# Altium PCB ProPrj_Project Ignis_2026-06-03.PcbDoc (part 1 of 2)
Units mm, origin at the board's own origin, x right, y up, seen from the top; angles counter-clockwise.
Board outline 123.2 x 67.87 mm, 18 copper layers (F.Cu, F.Mask, B.Cu, B.Mask, F.SilkS, B.SilkS, F.Adhes, B.Adhes, F.Paste, B.Paste, Dwgs.User, Cmts.User, Eco1.User, Eco2.User, Edge.Cuts, Margin, B.CrtYd, F.CrtYd); 71 components, 0 nets, 328 pads, 147 vias.
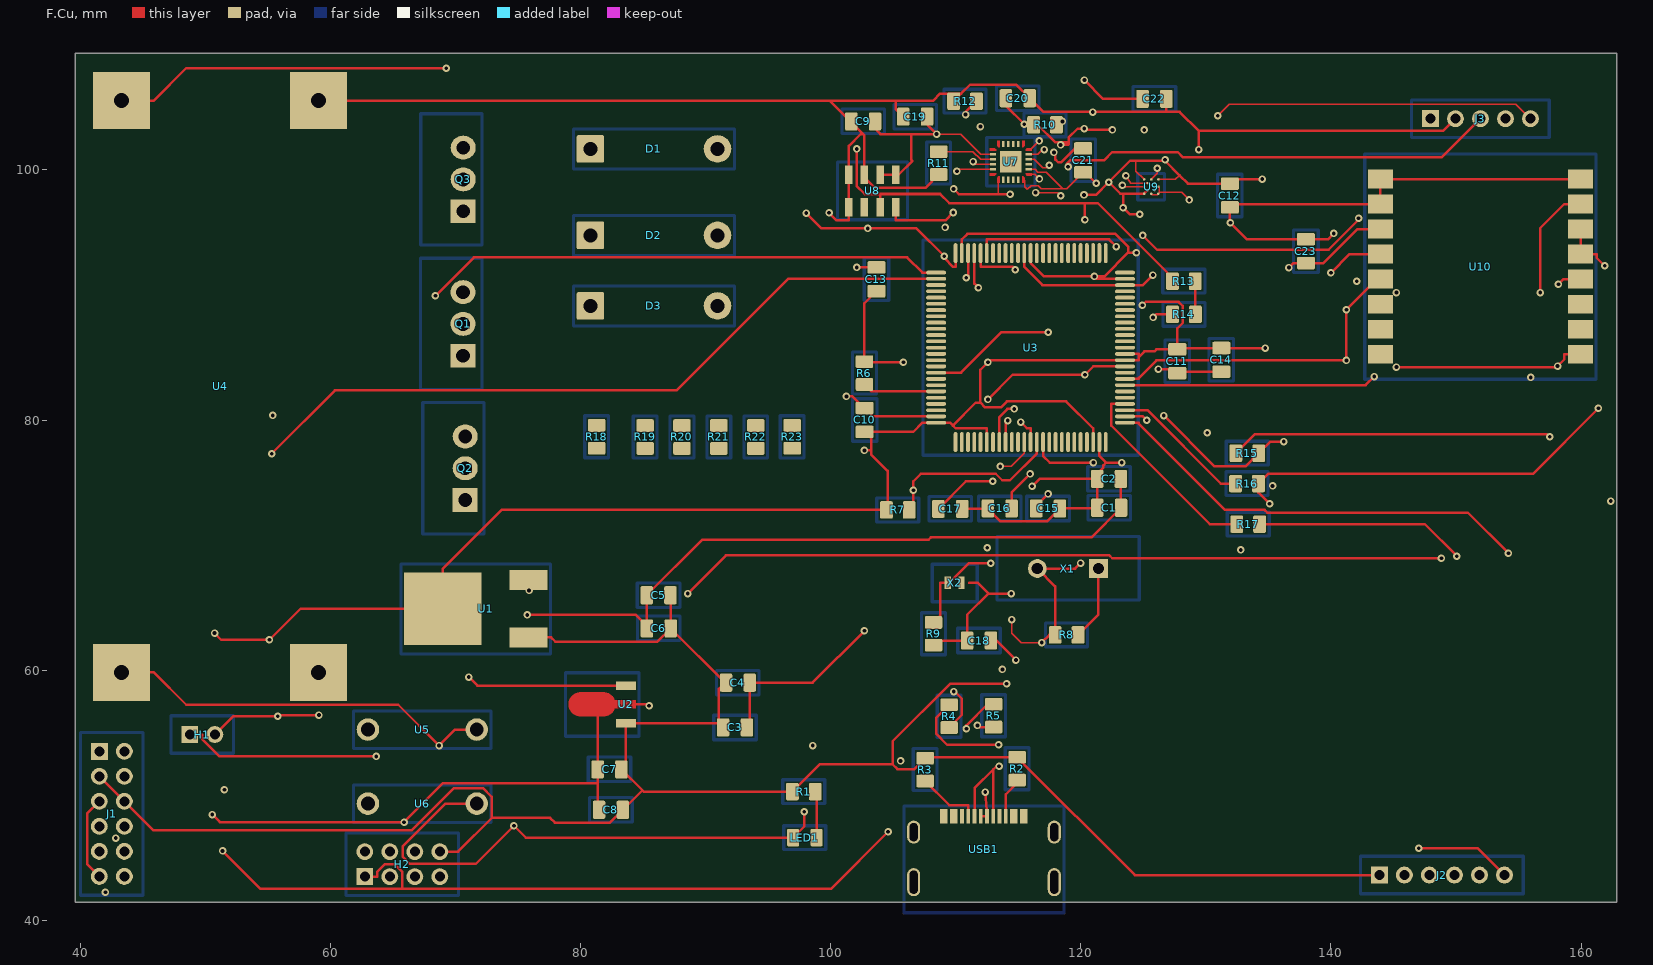
[diagram p0: F.Cu view]
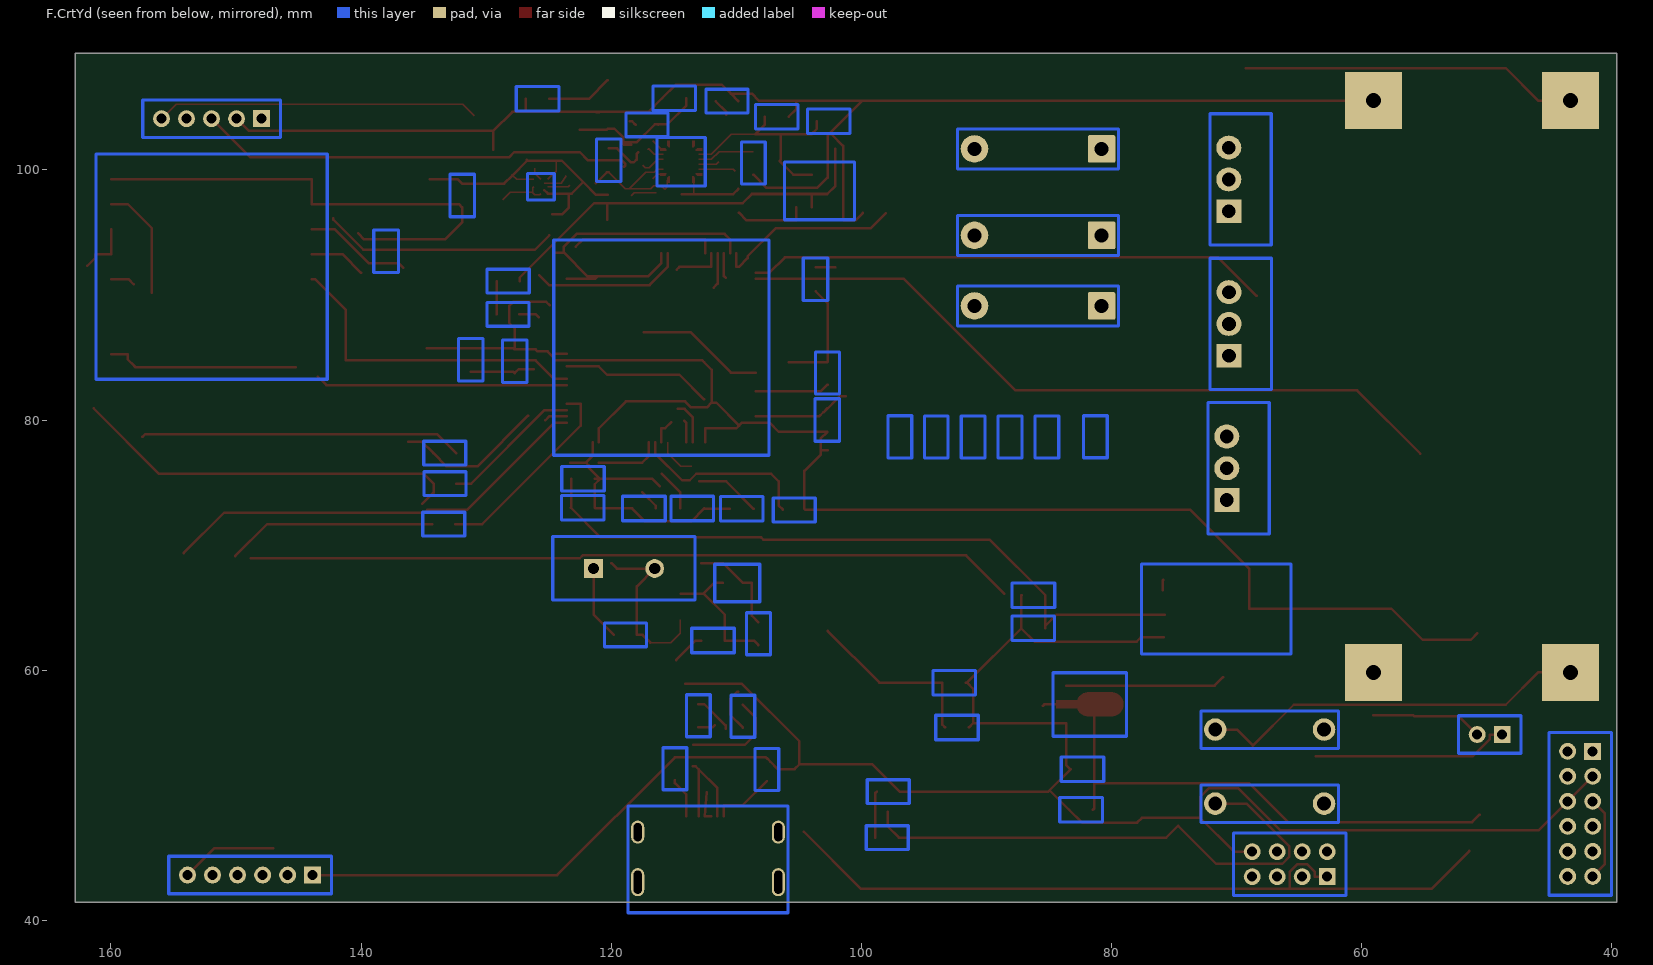
[diagram p1: F.CrtYd view, seen from below]
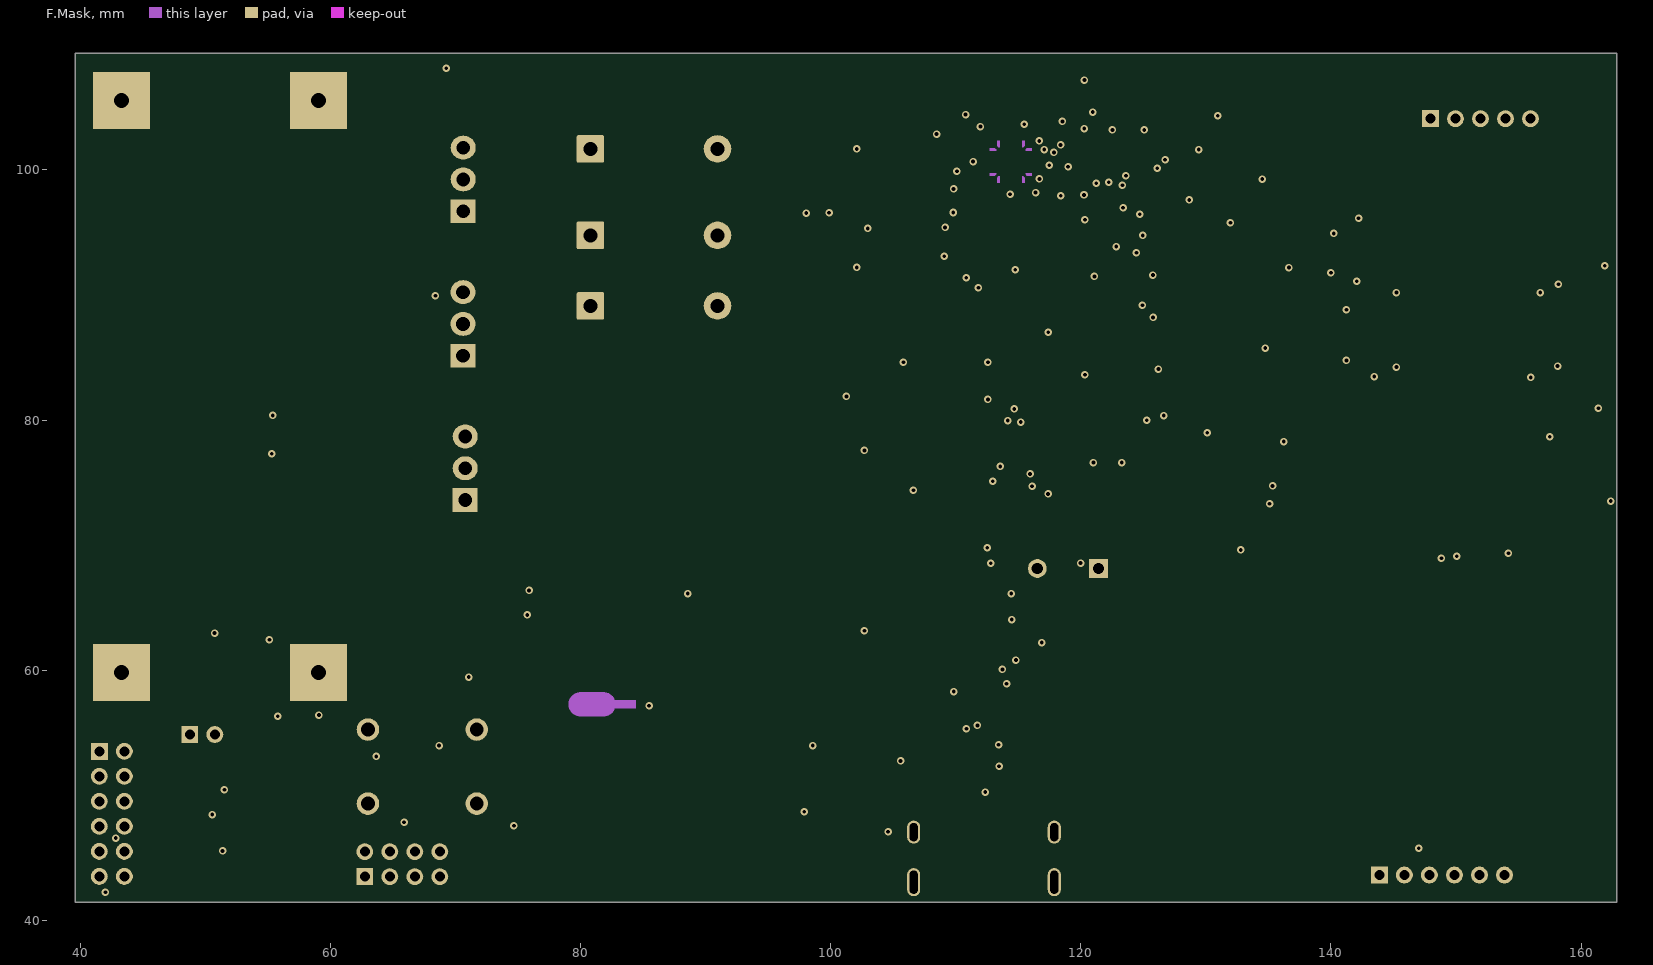
[diagram p2: F.Mask]
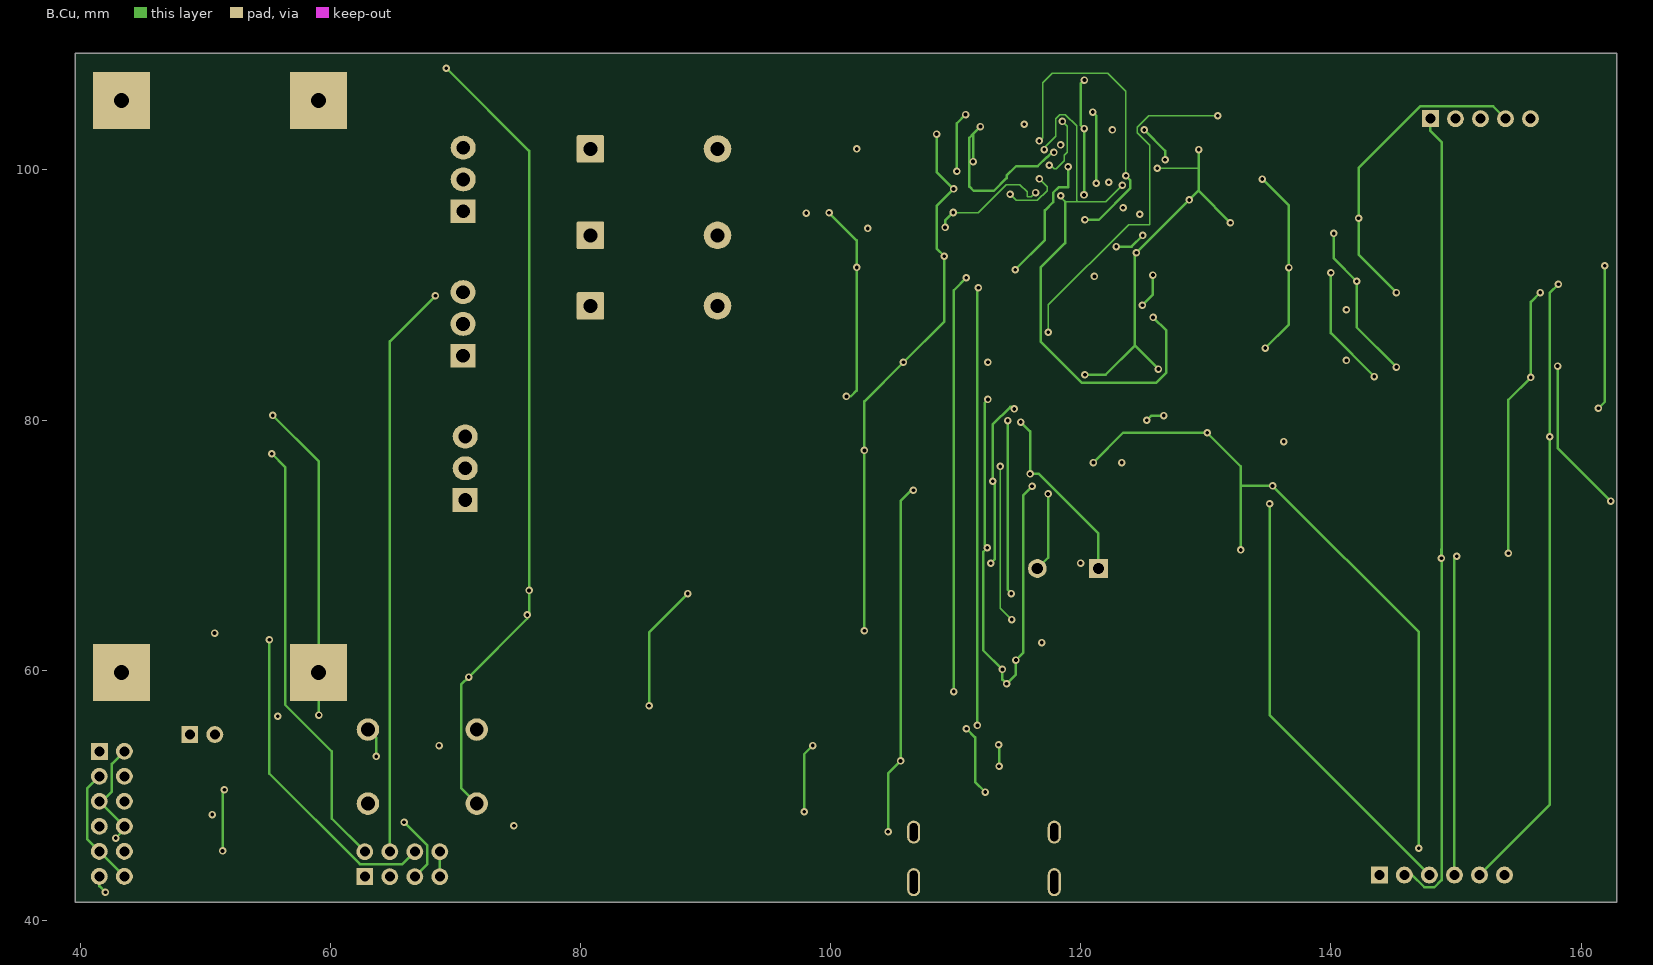
[diagram p3: B.Cu]
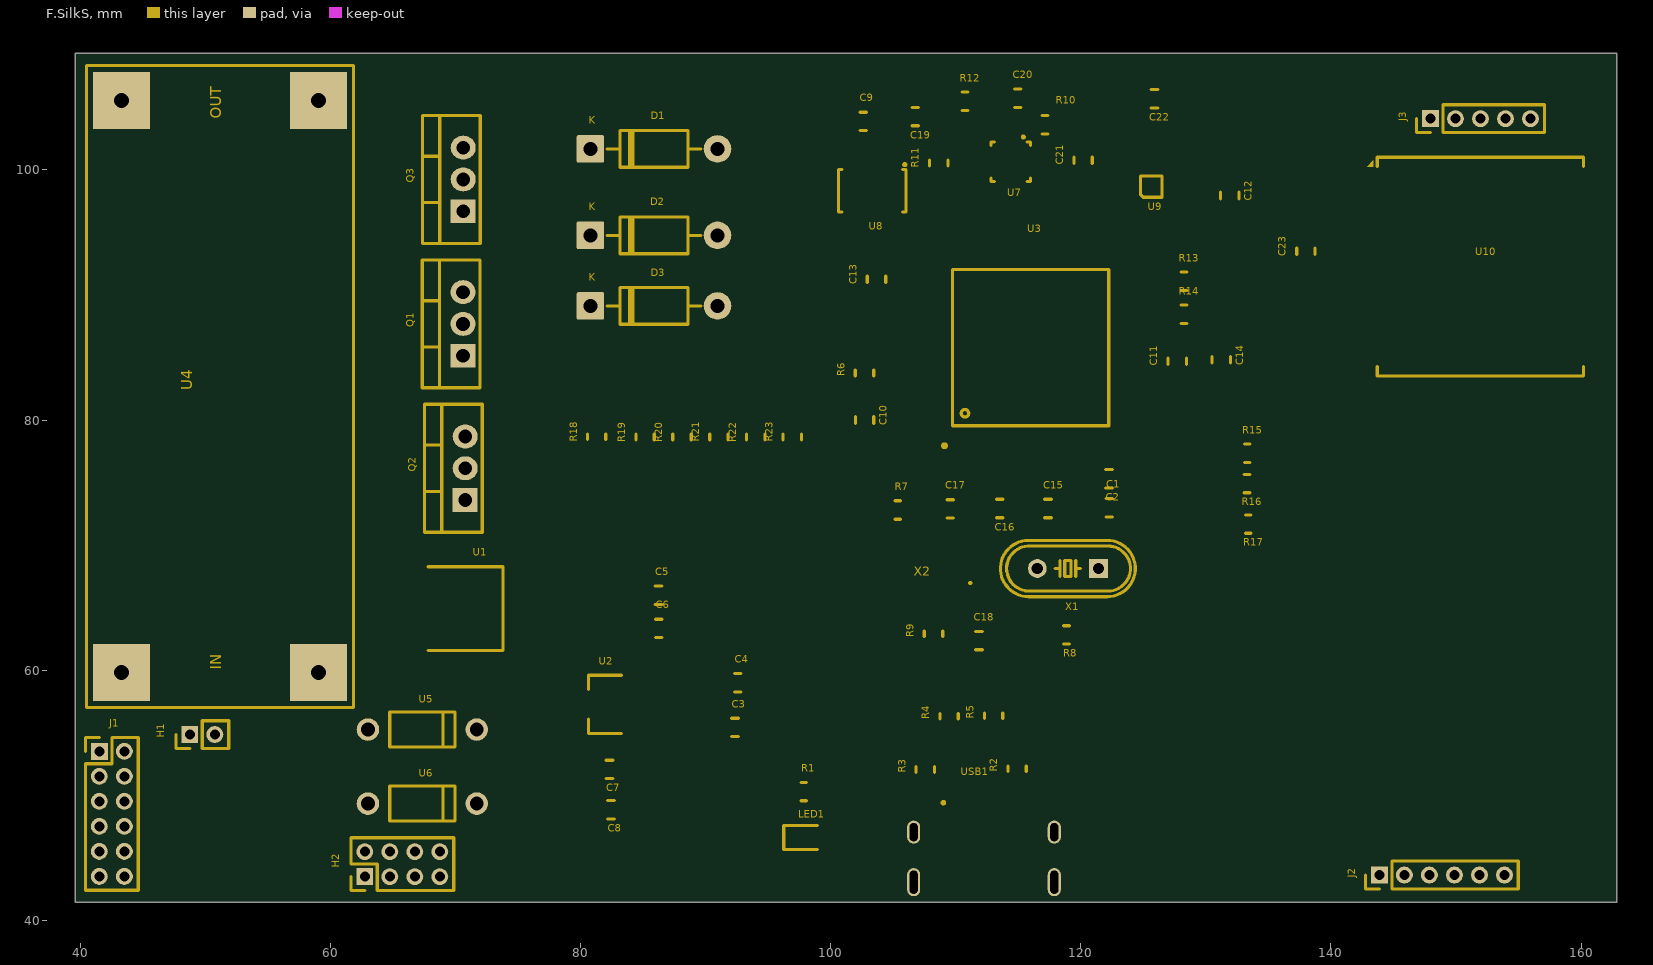
[diagram p4: F.SilkS]
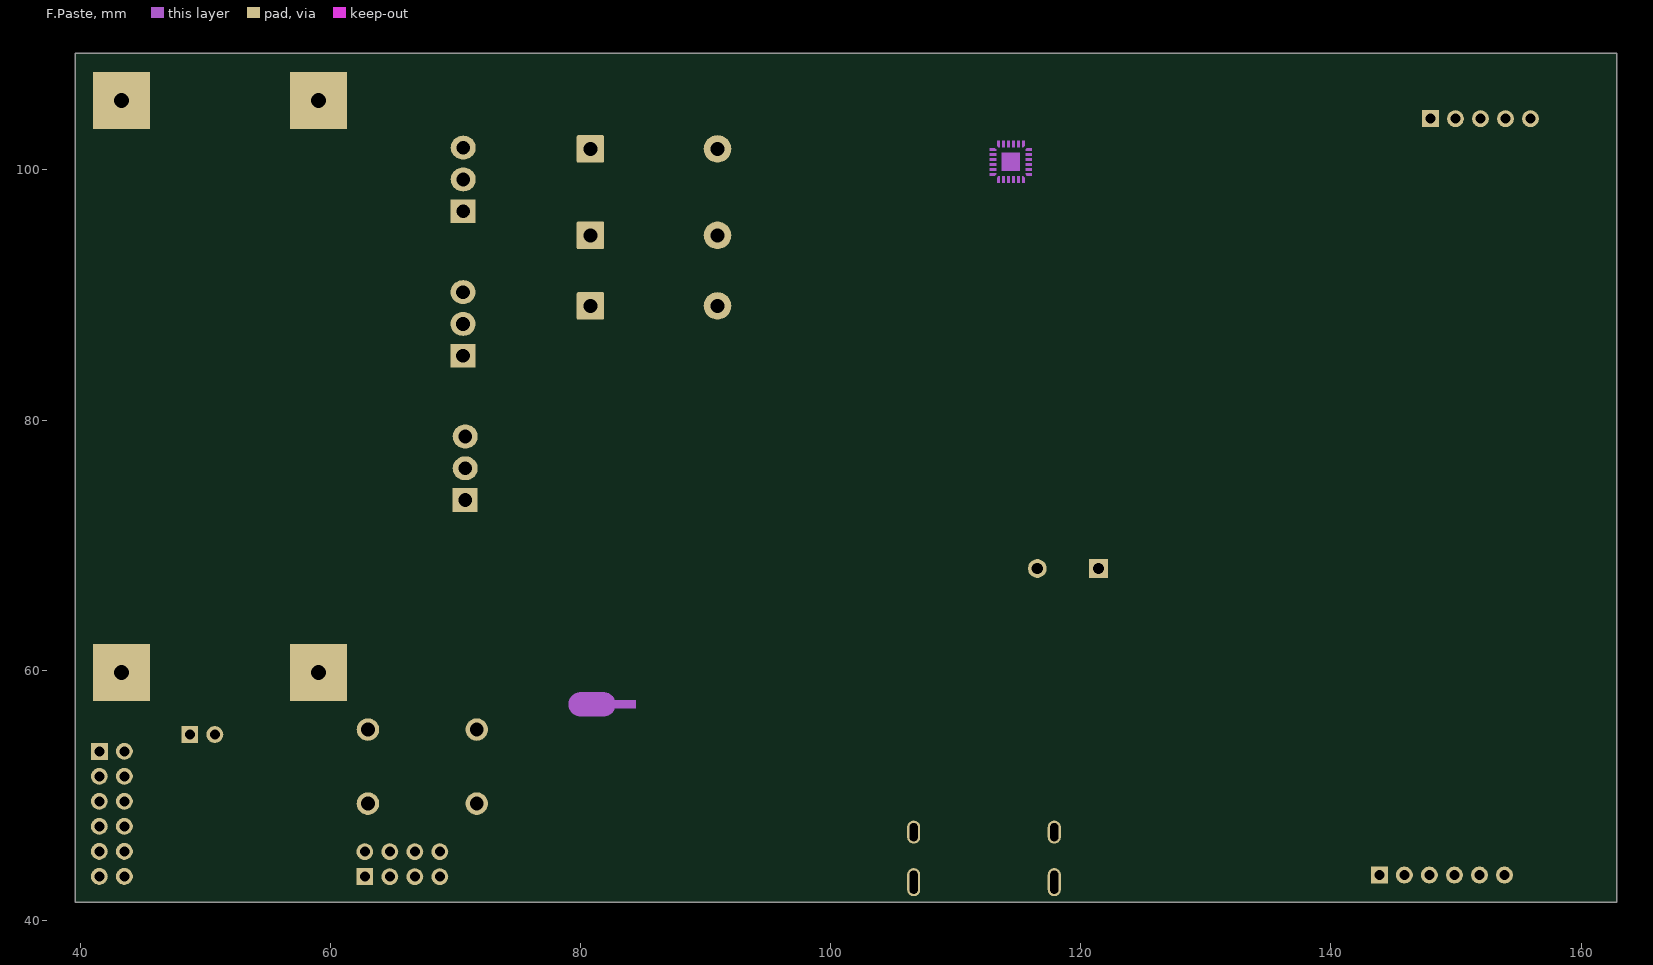
[diagram p5: F.Paste]
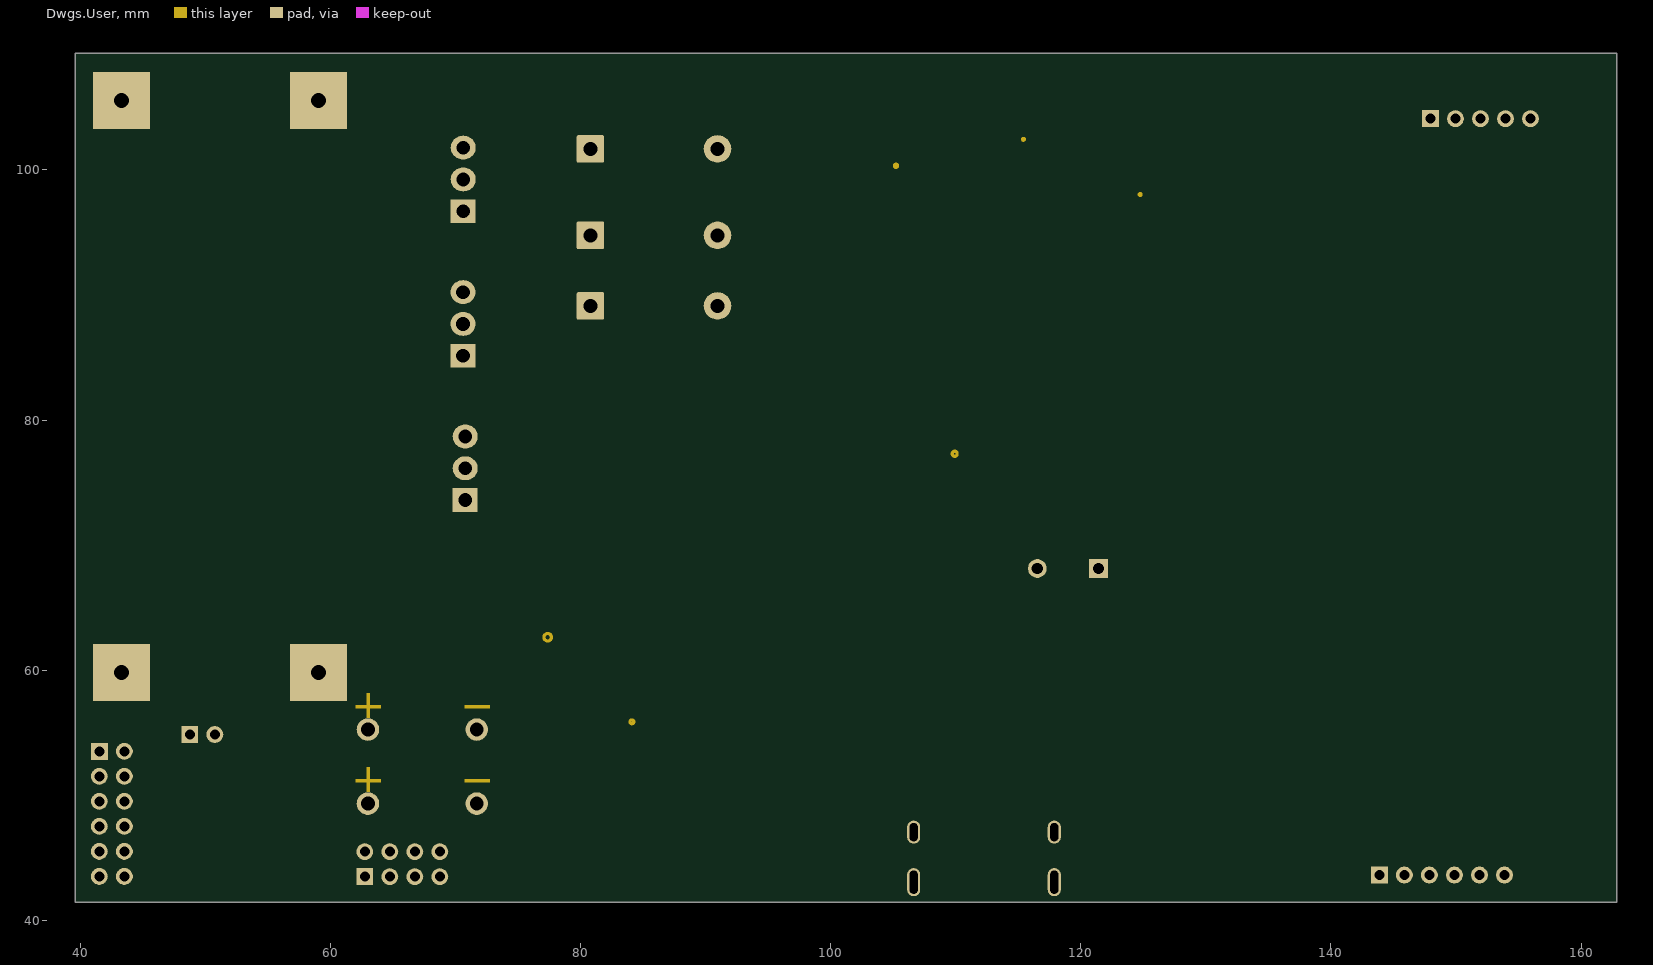
[diagram p6: Dwgs.User]
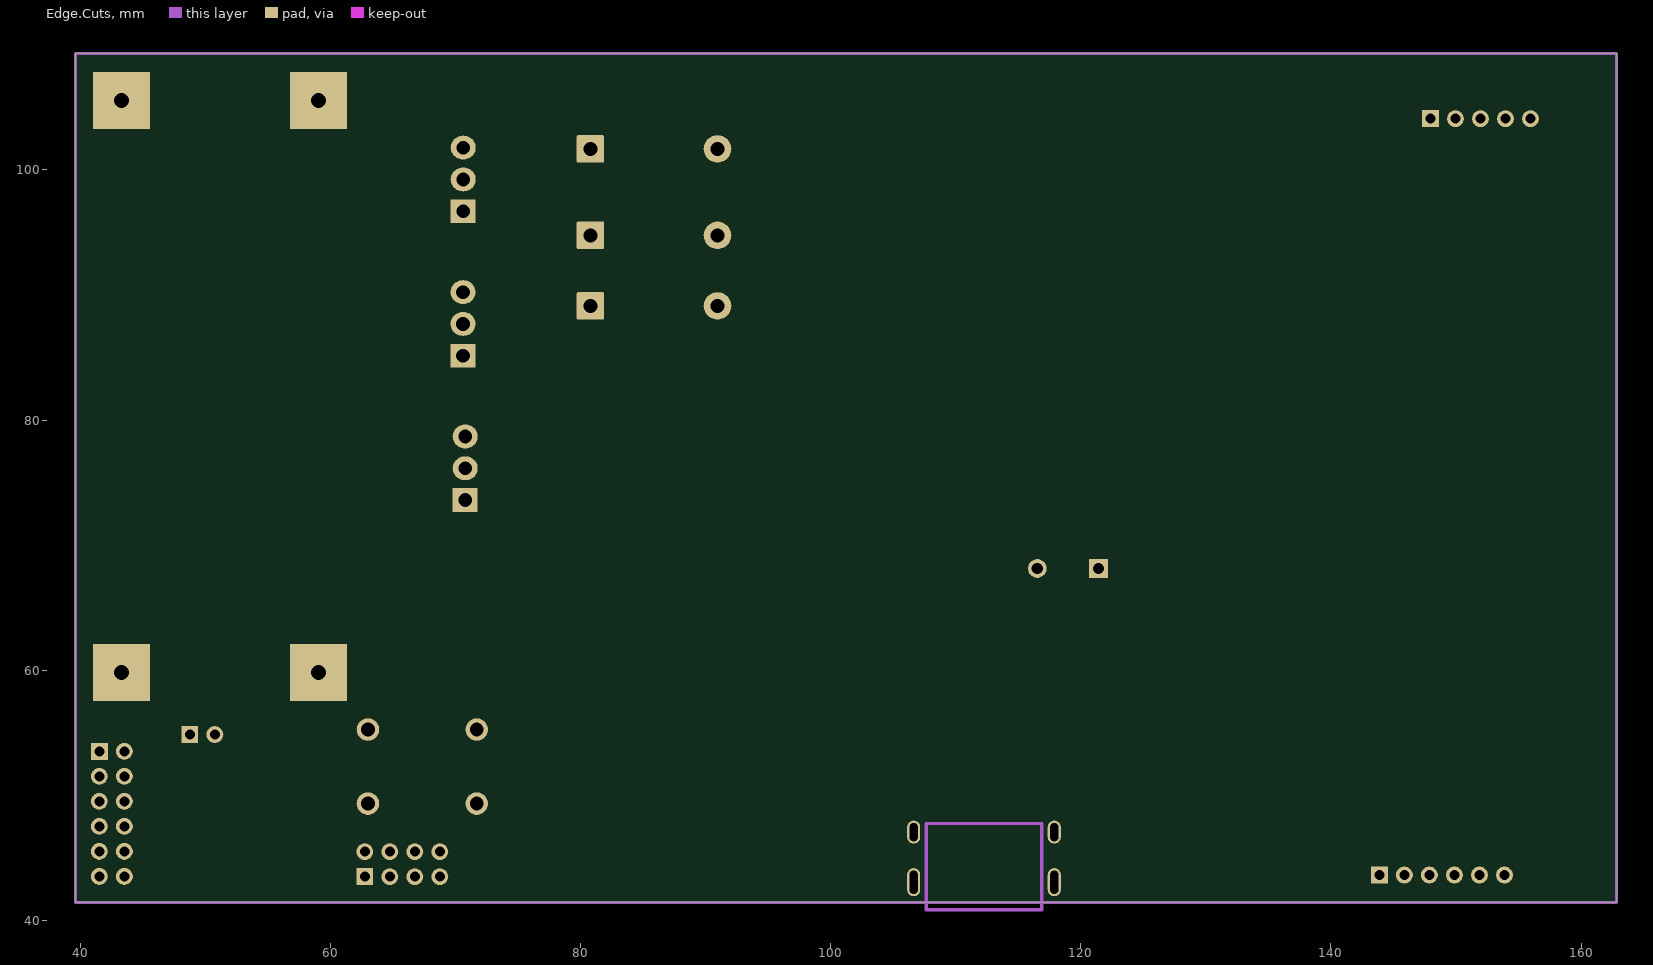
[diagram p7: Edge.Cuts]

## Layer stack, top to bottom
Top Solder: solder mask 0.0102, Solder Resist, Dk 3.5
F.Cu: signal copper 0.0356
Dielectric 1: dielectric 0.32, FR-4, Dk 4.8
F.Mask: signal copper 0.0356
Dielectric2: dielectric 0.32, FR-4, Dk 4.8
B.Cu: signal copper 0.0356
Dielectric3: dielectric 0.32, FR-4, Dk 4.8
B.Mask: signal copper 0.0356
Dielectric4: dielectric 0.32, FR-4, Dk 4.8
F.SilkS: signal copper 0.0356
Dielectric5: dielectric 0.32, FR-4, Dk 4.8
B.SilkS: signal copper 0.0356
Dielectric6: dielectric 0.32, FR-4, Dk 4.8
F.Adhes: signal copper 0.0356
Dielectric7: dielectric 0.32, FR-4, Dk 4.8
B.Adhes: signal copper 0.0356
Dielectric8: dielectric 0.32, FR-4, Dk 4.8
F.Paste: signal copper 0.0356
Dielectric9: dielectric 0.32, FR-4, Dk 4.8
B.Paste: signal copper 0.0356
Dielectric10: dielectric 0.32, FR-4, Dk 4.8
Dwgs.User: signal copper 0.0356
Dielectric11: dielectric 0.32, FR-4, Dk 4.8
Cmts.User: signal copper 0.0356
Dielectric12: dielectric 0.32, FR-4, Dk 4.8
Eco1.User: signal copper 0.0356
Dielectric13: dielectric 0.32, FR-4, Dk 4.8
Eco2.User: signal copper 0.0356
Dielectric14: dielectric 0.32, FR-4, Dk 4.8
Edge.Cuts: signal copper 0.0356
Dielectric15: dielectric 0.32, FR-4, Dk 4.8
Margin: signal copper 0.0356
Dielectric16: dielectric 0.32, FR-4, Dk 4.8
B.CrtYd: signal copper 0.0356
Dielectric17: dielectric 0.32, FR-4, Dk 4.8
F.CrtYd: signal copper 0.0356
Bottom Solder: solder mask 0.0102, Solder Resist, Dk 3.5

## Board outline
39.634,41.441 39.634,109.311 162.834,109.311 162.834,41.441

## Design rules (kind name [scope] priority, off if disabled: settings)
Clearance "Clearence 0.2_NetClass" [InNetClass('Default')] p1: gap=0.2 ignorepadtopadclearanceinfootprint=FALSE
MinimumSolderMaskSliver [All] p1: minsoldermaskwidth=0
PolygonConnect [All] p1: connectstyle=Direct reliefconductorwidth=0.254 reliefentries=4 polygonreliefangle="90 Angle" airgapwidth=0.254
RoutingVias [All] p1: holewidth=0.711 width=1.27 viastyle="Through Hole" minholewidth=0.711 minwidth=1.27 maxholewidth=0.711 maxwidth=1.27
SilkToSilkClearance [All] p1: silktosilkclearance=0
SilkToSolderMaskClearance [IsPad] p1: minsilkscreentomaskgap=0 clearancetoexposedcopper=TRUE
SolderMaskExpansion [All] p1: expansion=0 istentingtop=FALSE
Width [All] p1: maxlimit=10 minlimit=0.254 preferedwidth=0.254 toplayer_prefwidth=0.2 midlayer1_maxwidth=0.254 midlayer2_prefwidth=0.2 midlayer3_maxwidth=0.254 midlayer5_prefwidth=0.2 midlayer7_maxwidth=0.254 midlayer9_maxwidth=0.254 midlayer11_maxwidth=0.254 midlayer13_prefwidth=0.2 midlayer15_maxwidth=0.254 midlayer17_prefwidth=0.2 midlayer19_maxwidth=0.254 midlayer21_maxwidth=0.254 midlayer23_maxwidth=0.254 midlayer25_prefwidth=0.2 midlayer27_maxwidth=0.254 midlayer29_maxwidth=0.254 bottomlayer_prefwidth=0.2 minimp=50.000000 maximp=50.000000 favimp=50.000000
27 further rules are at their usual default settings.

## Components (designator, comment, footprint, x,y, rotation, side; value= is the part's Value field where it differs from the comment)
C1 "Comment" C_0805_2012Metric 122.271,72.995 r0 top value=100nF
C2 "Comment" C_0805_2012Metric 122.261,75.305 r180 top value=100nF
C3 "Comment" C_0805_2012Metric 92.361,55.428 r0 top value=100nF
C4 "Comment" C_0805_2012Metric 92.591,59.008 r0 top value=100nF
C5 "Comment" C_0805_2012Metric 86.251,65.998 r0 top value=100nF
C6 "Comment" C_0805_2012Metric 86.271,63.348 r0 top value=100nF
C7 "Comment" C_0805_2012Metric 82.331,52.078 r180 top value=100nF
C8 "Comment" C_0805_2012Metric 82.441,48.848 r180 top value=100nF
C9 "Comment" C_0805_2012Metric 102.604,103.881 r0 top value=100nF
C10 "Comment" C_0805_2012Metric 102.721,80.015 r270 top value=100nF
C11 "Comment" C_0805_2012Metric 127.721,84.705 r90 top value=100nF
C12 "Comment" C_0805_2012Metric 131.921,97.955 r270 top value=100nF
C13 "Comment" C_0805_2012Metric 103.671,91.255 r90 top value=100nF
C14 "Comment" C_0805_2012Metric 131.241,84.815 r270 top value=100nF
C15 "Comment" C_0805_2012Metric 117.391,72.935 r0 top value=100nF
C16 "Comment" C_0805_2012Metric 113.521,72.935 r180 top value=100nF
C17 "Comment" C_0805_2012Metric 109.571,72.905 r0 top value=100nF
C18 "Comment" C_0805_2012Metric 111.871,62.375 r0 top value=100nF
C19 "Comment" C_0805_2012Metric 106.764,104.261 r180 top value=100nF
C20 "Comment" C_0805_2012Metric 114.971,105.735 r0 top value=100nF
C21 "Comment" C_0805_2012Metric 120.191,100.765 r90 top value=100nF
C22 "Comment" C_0805_2012Metric 125.891,105.685 r180 top value=100nF
C23 "Comment" C_0805_2012Metric 138.001,93.505 r90 top value=100nF
D1 "Comment" D_DO-41_SOD81_P10.16mm_Horizontal 80.801,101.678 r0 top value=1N4007
D2 "Comment" D_DO-41_SOD81_P10.16mm_Horizontal 80.801,94.768 r0 top value=1N4007
D3 "Comment" D_DO-41_SOD81_P10.16mm_Horizontal 80.801,89.128 r0 top value=1N4007
H1 "Comment" PinHeader_1x02_P2.00mm_Vertical 48.774,54.861 r90 top value=PZ254V-11-02P
H2 "Comment" PinHeader_2x04_P2.00mm_Vertical 62.764,43.501 r90 top value=PZ254V-12-8P
J1 "Comment" PinHeader_2x06_P2.00mm_Vertical 41.544,53.521 r0 top value=Conn_02x06_Top_Bottom
J2 "Comment" PinHeader_1x06_P2.00mm_Vertical 143.874,43.631 r90 top value=Conn_01x06_Pin
J3 "Comment" PinHeader_1x05_P2.00mm_Vertical 147.954,104.101 r90 top value=Conn_01x05_Pin
LED1 "Comment" LED_0805_2012Metric 97.942,46.623 r0 top value=~
Q1 "Comment" TO-220-3_Vertical 70.624,85.151 r90 top value=IRLZ44N
Q2 "Comment" TO-220-3_Vertical 70.794,73.611 r90 top value=IRLZ44N
Q3 "Comment" TO-220-3_Vertical 70.634,96.701 r90 top value=IRLZ44N
R1 "Comment" R_0805_2012Metric 97.859,50.303 r0 top value=10K
R2 "Comment" R_0805_2012Metric 114.914,52.13 r90 top value=10K
R3 "Comment" R_0805_2012Metric 107.564,52.06 r90 top value=10K
R4 "Comment" R_0805_2012Metric 109.477,56.327 r90 top value=10K
R5 "Comment" R_0805_2012Metric 113.034,56.37 r90 top value=10K
R6 "Comment" R_0805_2012Metric 102.711,83.757 r90 top value=10K
R7 "Comment" R_0805_2012Metric 105.374,72.815 r0 top value=10K
R8 "Comment" R_0805_2012Metric 118.871,62.825 r180 top value=10K
R9 "Comment" R_0805_2012Metric 108.231,62.917 r90 top value=10K
R10 "Comment" R_0805_2012Metric 117.146,103.61 r180 top value=10K
R11 "Comment" R_0805_2012Metric 108.641,100.545 r90 top value=10K
R12 "Comment" R_0805_2012Metric 110.751,105.495 r0 top value=10K
R13 "Comment" R_0805_2012Metric 128.244,91.105 r0 top value=4.7K
R14 "Comment" R_0805_2012Metric 128.251,88.455 r0 top value=4.7K
R15 "Comment" R_0805_2012Metric 133.314,77.355 r0 top value=10K
R16 "Comment" R_0805_2012Metric 133.294,74.925 r180 top value=10K
R17 "Comment" R_0805_2012Metric 133.388,71.685 r180 top value=10K
R18 "Comment" R_0805_2012Metric 81.296,78.668 r90 top value=VALUE
R19 "Comment" R_0805_2012Metric 85.171,78.651 r90 top value=VALUE
R20 "Comment" R_0805_2012Metric 88.121,78.651 r90 top value=VALUE
R21 "Comment" R_0805_2012Metric 91.071,78.651 r90 top value=VALUE
R22 "Comment" R_0805_2012Metric 94.021,78.651 r90 top value=VALUE
R23 "Comment" R_0805_2012Metric 96.934,78.664 r90 top value=VALUE
U1 "Comment" TO-252-2_L6.6-W5.6-P2.3-LS9.7 72.428,64.921 r0 top value=AMS1117-3.3
U2 "Comment" SOT-89-3_L4.5-W2.4-P1.50-LS4.0-BR 82.288,57.279 r0 top value=AMS1117-5.0
U3 "Comment" LQFP-100_L14.0-W14.0-P0.50-LS16.0-BL 115.991,85.795 r0 top value=STM32G473VET6
U4 "Comment" DC_DC_LM2596_small 51.19,82.691 r90 top value=DC_DC_small
U5 "Comment" DO-41_BD2.4-L4.7-P8.70-D0.8-FD 67.364,55.261 r0 top value=IN5819
U6 "Comment" DO-41_BD2.4-L4.7-P8.70-D0.8-FD 67.364,49.341 r0 top value=IN5819
U7 "Comment" QFN-24_L3.0-W3.0-P0.40-BL-EP 114.414,100.651 r180 top value=MPU-6500
U8 "Comment" SENSORS-SMD_MS5611-01BA03 103.336,98.325 r180 top value=MS561101BA03-50
U9 "Comment" WLCSP-12_L1.6-W1.6_BMM150 125.638,98.672 r180 top value=BMM150
U10 "Comment" Ai-Thinker-Ra-01-LoRa 151.954,92.271 r0 top value=Ai-Thinker-Ra-02
USB1 "Comment" TE_2340901-1 112.264,43.061 r0 top value=USBC1-AF-046
X1 "Comment" HC-49US_L11.5-W4.5-P4.88 118.972,68.135 r180 top value=8MHz
X2 "Comment" ABS0532768KHZ6T 109.923,66.98 r180 top value=32.768kHz

## Footprints (in the part's own frame and the unit in brackets; to place one, negate y for a bottom-side part, rotate by r counter-clockwise, add the part's x,y. Pads: shape width x height; smd on the part's side, far side on the other; paste and mask are expansions set on the pad)
ABS0532768KHZ6T [mm]
  rect 0.5x1 smd paste-1 mask-1: 1(-0.55,0) 2(0.55,0)
  F.SilkS lines w0.254: -1.2,0 cw(c-1.25,0) -1.3,0 cw(c-1.25,0) -1.2,0
  F.CrtYd lines w0.254: 1.8,1.5 -1.8,1.5 -1.8,-1.5 1.8,-1.5 1.8,1.5
Ai-Thinker-Ra-01-LoRa [mm]
  rect 2x1.5 smd paste-2 mask-2: 1(-8,7) 2(-8,5) 3(-8,3) 4(-8,1) 5(-8,-1) 6(-8,-3) 7(-8,-5) 8(-8,-7) 9(8,-7) 10(8,-5) 11(8,-3) 12(8,-1) 13(8,1) 14(8,3) 15(8,5) 16(8,7)
  F.SilkS region: -8.55,8 -9.05,8 -8.55,8.5
  F.SilkS lines w0.254: -8.25,-8 -8.25,-8.75 8.25,-8.75 8.25,-8 ; -8.25,8 -8.25,8.75 8.25,8.75 8.25,8
  F.CrtYd lines w0.254: -9.25,-9 9.25,-9 9.25,9 -9.25,9 -9.25,-9
C_0805_2012Metric [mm]
  rrect25% 1x1.45 smd paste-1.45 mask-1.45: 1(-0.95,0) 2(0.95,0)
  F.SilkS lines w0.254: -0.261,-0.735 0.261,-0.735 ; -0.261,0.735 0.261,0.735
  F.CrtYd lines w0.254: -1.7,-0.98 1.7,-0.98 1.7,0.98 -1.7,0.98 -1.7,-0.98
D_DO-41_SOD81_P10.16mm_Horizontal [mm]
  rrect11% 2.2x2.2 hole 1.1 paste-2539.97 mask-2.2: 1(0,0)
  round 2.2 hole 1.1 paste-2539.97 mask-2.2: 2(10.16,0)
  F.SilkS lines w0.254: 1.34,0 2.36,0 ; 3.14,-1.47 3.14,1.47 ; 3.26,-1.47 3.26,1.47 ; 3.38,-1.47 3.38,1.47 ; 7.8,0 8.82,0 ; 2.36,-1.47 7.8,-1.47 7.8,1.47 2.36,1.47 2.36,-1.47
  F.CrtYd lines w0.254: -1.35,-1.6 11.51,-1.6 11.51,1.6 -1.35,1.6 -1.35,-1.6
DC_DC_LM2596_small [mil]
  rect 180x180 hole 47.24 paste-99999 mask-180: 1(-900,310) 2(-900,-310) 3(900,310) 4(900,-310)
  F.SilkS lines w10: -1010,420 1010,420 1010,-420 110,-420 -110,-420 -1010,-420 -1010,420
DO-41_BD2.4-L4.7-P8.70-D0.8-FD [mm]
  round 1.8 hole 1.1 paste-2539.97 mask-1.8: 1(-4.35,0) 2(4.35,0)
  F.SilkS lines w0.254: 1.64,-1.4 1.64,1.4 ; -2.6,-1.4 -2.6,1.4 2.6,1.4 2.6,-1.4 -2.6,-1.4
  Dwgs.User region: 5.38,1.72 3.39,1.72 3.39,1.95 5.38,1.95
  Dwgs.User region: -4.2,0.93 -4.43,0.93 -4.43,2.92 -4.2,2.92
  Dwgs.User region: -3.32,1.72 -5.31,1.72 -5.31,1.95 -3.32,1.95
  F.CrtYd lines w0.254: -5.5,-1.505 5.5,-1.505 5.5,1.476 -5.5,1.476 -5.5,-1.505
HC-49US_L11.5-W4.5-P4.88 [mm]
  rect 1.501x1.501 hole 0.899 paste-2539.97 mask-1.501: 1(-2.441,0)
  round 1.501 hole 0.899 paste-2539.97 mask-1.501: 2(2.441,0)
  F.SilkS lines w0.254: 1.016,0 0.635,0 ; 0.635,0.635 0.635,0 ; 0.635,-0.635 0.635,0 ; -0.635,0.635 -0.635,0 ; -0.635,-0.635 -0.635,0 ; -1.016,0 -0.635,0 ; -3.15,2.251 3.15,2.251 cw(c3.142,0) 3.15,-2.25 3.15,-2.251 -3.15,-2.251 cw(c-3.142,0) -3.15,2.25 ; 3.2,1.801 3.2,1.8 cw(c3.093,0) 2.999,-1.801 -3.2,-1.801 -3.2,-1.8 cw(c-3.2,0.001) -3.201,1.801 3.2,1.801 ; 0.254,0.635 -0.254,0.635 -0.254,-0.635 0.254,-0.635 0.254,0.635
  F.CrtYd lines w0.254: 5.668,2.526 -5.699,2.526 -5.699,-2.557 5.668,-2.557 5.668,2.526
LED_0805_2012Metric [mm]
  rrect25% 0.975x1.4 smd paste-1.4 mask-1.4: 1(-0.937,0) 2(0.937,0)
  F.SilkS lines w0.254: 1,-0.96 -1.685,-0.96 -1.685,0.96 1,0.96
  F.CrtYd lines w0.254: -1.68,-0.95 1.68,-0.95 1.68,0.95 -1.68,0.95 -1.68,-0.95
LQFP-100_L14.0-W14.0-P0.50-LS16.0-BL [mm]
  rrect100% 0.3x1.6 smd paste-1.6 mask-1.6: 1(-6,-7.55) 2(-5.5,-7.55) 3(-5,-7.55) 4(-4.5,-7.55) 5(-4,-7.55) 6(-3.5,-7.55) 7(-3,-7.55) 8(-2.5,-7.55) 9(-2,-7.55) 10(-1.5,-7.55) 11(-1,-7.55) 12(-0.5,-7.55) 13(0,-7.55) 14(0.5,-7.55) 15(1,-7.55) 16(1.5,-7.55) 17(2,-7.55) 18(2.5,-7.55) 19(3,-7.55) 20(3.5,-7.55) 21(4,-7.55) 22(4.5,-7.55) 23(5,-7.55) 24(5.5,-7.55) 25(6,-7.55) 51(6,7.55) 52(5.5,7.55) 53(5,7.55) 54(4.5,7.55) 55(4,7.55) 56(3.5,7.55) 57(3,7.55) 58(2.5,7.55) 59(2,7.55) 60(1.5,7.55) 61(1,7.55) 62(0.5,7.55) 63(0,7.55) 64(-0.5,7.55) 65(-1,7.55) 66(-1.5,7.55) 67(-2,7.55) 68(-2.5,7.55) 69(-3,7.55) 70(-3.5,7.55) 71(-4,7.55) 72(-4.5,7.55) 73(-5,7.55) 74(-5.5,7.55) 75(-6,7.55)
  rrect100% 1.6x0.3 smd paste-1.6 mask-1.6: 26(7.55,-6) 27(7.55,-5.5) 28(7.55,-5) 29(7.55,-4.5) 30(7.55,-4) 31(7.55,-3.5) 32(7.55,-3) 33(7.55,-2.5) 34(7.55,-2) 35(7.55,-1.5) 36(7.55,-1) 37(7.55,-0.5) 38(7.55,0) 39(7.55,0.5) 40(7.55,1) 41(7.55,1.5) 42(7.55,2) 43(7.55,2.5) 44(7.55,3) 45(7.55,3.5) 46(7.55,4) 47(7.55,4.5) 48(7.55,5) 49(7.55,5.5) 50(7.55,6) 76(-7.55,6) 77(-7.55,5.5) 78(-7.55,5) 79(-7.55,4.5) 80(-7.55,4) 81(-7.55,3.5) 82(-7.55,3) 83(-7.55,2.5) 84(-7.55,2) 85(-7.55,1.5) 86(-7.55,1) 87(-7.55,0.5) 88(-7.55,0) 89(-7.55,-0.5) 90(-7.55,-1) 91(-7.55,-1.5) 92(-7.55,-2) 93(-7.55,-2.5) 94(-7.55,-3) 95(-7.55,-3.5) 96(-7.55,-4) 97(-7.55,-4.5) 98(-7.55,-5) 99(-7.55,-5.5) 100(-7.55,-6)
  F.SilkS lines w0.254: -6.883,-7.696 ccw(c-6.882,-7.846) -6.881,-7.696 ; -5.25,-4.951 ccw(c-5.248,-5.251) -5.245,-4.951 ; -6.25,-6.25 6.25,-6.25 6.25,6.25 -6.25,6.25 -6.25,-6.25
  Dwgs.User circle w0.254: c-6.071,-8.484 r0.2
  F.CrtYd lines w0.254: -8.6,-8.6 8.6,-8.6 8.6,8.6 -8.6,8.6 -8.6,-8.6
PinHeader_1x02_P2.00mm_Vertical [mm]
  rect 1.35x1.35 hole 0.8 paste-2539.97 mask-1.35: 1(0,0)
  round 1.35 hole 0.8 paste-2539.97 mask-1.35: 2(0,-2)
  F.SilkS lines w0.254: 0,1.11 -1.11,1.11 -1.11,0 ; -1.11,-1 1.11,-1 1.11,-3.11 -1.11,-3.11 -1.11,-1
  F.CrtYd lines w0.254: -1.5,1.5 1.5,1.5 1.5,-3.5 -1.5,-3.5 -1.5,1.5
PinHeader_1x05_P2.00mm_Vertical [mm]
  rect 1.35x1.35 hole 0.8 paste-2539.97 mask-1.35: 1(0,0)
  round 1.35 hole 0.8 paste-2539.97 mask-1.35: 2(0,-2) 3(0,-4) 4(0,-6) 5(0,-8)
  F.SilkS lines w0.254: 0,1.11 -1.11,1.11 -1.11,0 ; -1.11,-1 1.11,-1 1.11,-9.11 -1.11,-9.11 -1.11,-1
  F.CrtYd lines w0.254: -1.5,1.5 1.5,1.5 1.5,-9.5 -1.5,-9.5 -1.5,1.5
PinHeader_1x06_P2.00mm_Vertical [mm]
  rect 1.35x1.35 hole 0.8 paste-2539.97 mask-1.35: 1(0,0)
  round 1.35 hole 0.8 paste-2539.97 mask-1.35: 2(0,-2) 3(0,-4) 4(0,-6) 5(0,-8) 6(0,-10)
  F.SilkS lines w0.254: 0,1.11 -1.11,1.11 -1.11,0 ; -1.11,-1 1.11,-1 1.11,-11.11 -1.11,-11.11 -1.11,-1
  F.CrtYd lines w0.254: -1.5,1.5 1.5,1.5 1.5,-11.5 -1.5,-11.5 -1.5,1.5
PinHeader_2x04_P2.00mm_Vertical [mm]
  rect 1.35x1.35 hole 0.8 paste-2539.97 mask-1.35: 1(0,0)
  round 1.35 hole 0.8 paste-2539.97 mask-1.35: 2(2,0) 3(0,-2) 4(2,-2) 5(0,-4) 6(2,-4) 7(0,-6) 8(2,-6)
  F.SilkS lines w0.254: 0,1.11 -1.11,1.11 -1.11,0 ; 1,1.11 3.11,1.11 3.11,-7.11 -1.11,-7.11 -1.11,-1 1,-1 1,1.11
  F.CrtYd lines w0.254: -1.5,1.5 3.5,1.5 3.5,-7.5 -1.5,-7.5 -1.5,1.5
PinHeader_2x06_P2.00mm_Vertical [mm]
  rect 1.35x1.35 hole 0.8 paste-2539.97 mask-1.35: 1(0,0)
  round 1.35 hole 0.8 paste-2539.97 mask-1.35: 2(2,0) 3(0,-2) 4(2,-2) 5(0,-4) 6(2,-4) 7(0,-6) 8(2,-6) 9(0,-8) 10(2,-8) 11(0,-10) 12(2,-10)
  F.SilkS lines w0.254: -1.11,0 -1.11,1.11 0,1.11 ; -1.11,-11.11 3.11,-11.11 3.11,1.11 1,1.11 1,-1 -1.11,-1 -1.11,-11.11
  F.CrtYd lines w0.254: -1.5,-11.5 3.5,-11.5 3.5,1.5 -1.5,1.5 -1.5,-11.5
QFN-24_L3.0-W3.0-P0.40-BL-EP [mm]
  rect 0.2x0.505 smd paste-0.505 mask-0.505: 2(-0.6,-1.428) 3(-0.2,-1.428) 4(0.2,-1.428) 5(0.6,-1.428) 14(0.6,1.428) 15(0.2,1.428) 16(-0.2,1.428) 17(-0.6,1.428)
  rect 0.505x0.2 smd paste-0.505 mask-0.505: 8(1.428,-0.6) 9(1.428,-0.2) 10(1.428,0.2) 11(1.428,0.6) 20(-1.428,0.6) 21(-1.428,0.2) 22(-1.428,-0.2) 23(-1.428,-0.6)
  rect 1.7x1.7 smd paste-1.7 mask-1.7: 25(0,0)
  F.Cu region: -1.175,-1 -1.275,-1.1 -1.68,-1.1 -1.68,-0.9 -1.175,-0.9
  F.Cu region: -1.175,1 -1.175,0.9 -1.68,0.9 -1.68,1.1 -1.275,1.1
  F.Cu region: -0.9,1.175 -1,1.175 -1.1,1.275 -1.1,1.68 -0.9,1.68
  F.Cu region: 1.1,1.275 1,1.175 0.9,1.175 0.9,1.68 1.1,1.68
  F.Cu region: 1.68,0.9 1.175,0.9 1.175,1 1.275,1.1 1.68,1.1
  F.Cu region: 1.68,-1.1 1.275,-1.1 1.175,-1 1.175,-0.9 1.68,-0.9
  F.Cu region: 1.1,-1.275 1.1,-1.68 0.9,-1.68 0.9,-1.175 1,-1.175
  F.Cu region: -0.9,-1.175 -0.9,-1.68 -1.1,-1.68 -1.1,-1.275 -1,-1.175
  F.Mask region: -1.175,-1 -1.275,-1.1 -1.68,-1.1 -1.68,-0.9 -1.175,-0.9
  F.Mask region: -1.175,1 -1.175,0.9 -1.68,0.9 -1.68,1.1 -1.275,1.1
  F.Mask region: -0.9,1.175 -1,1.175 -1.1,1.275 -1.1,1.68 -0.9,1.68
  F.Mask region: 1.1,1.275 1,1.175 0.9,1.175 0.9,1.68 1.1,1.68
  F.Mask region: 1.68,0.9 1.175,0.9 1.175,1 1.275,1.1 1.68,1.1
  F.Mask region: 1.68,-1.1 1.275,-1.1 1.175,-1 1.175,-0.9 1.68,-0.9
  F.Mask region: 1.1,-1.275 1.1,-1.68 0.9,-1.68 0.9,-1.175 1,-1.175
  F.Mask region: -0.9,-1.175 -0.9,-1.68 -1.1,-1.68 -1.1,-1.275 -1,-1.175
  F.SilkS circle w0.254: c-1,-1.98 r0.075
  F.SilkS lines w0.254: 1.576,1.302 1.576,1.576 1.302,1.576 ; 1.576,-1.302 1.576,-1.576 1.302,-1.576 ; -1.302,1.576 -1.576,1.576 -1.576,1.302 ; -1.302,-1.576 -1.576,-1.576 -1.576,-1.302
  F.Paste region: -1.175,-1 -1.275,-1.1 -1.68,-1.1 -1.68,-0.9 -1.175,-0.9
  F.Paste region: -1.175,1 -1.175,0.9 -1.68,0.9 -1.68,1.1 -1.275,1.1
  F.Paste region: -0.9,1.175 -1,1.175 -1.1,1.275 -1.1,1.68 -0.9,1.68
  F.Paste region: 1.1,1.275 1,1.175 0.9,1.175 0.9,1.68 1.1,1.68
  F.Paste region: 1.68,0.9 1.175,0.9 1.175,1 1.275,1.1 1.68,1.1
  F.Paste region: 1.68,-1.1 1.275,-1.1 1.175,-1 1.175,-0.9 1.68,-0.9
  F.Paste region: 1.1,-1.275 1.1,-1.68 0.9,-1.68 0.9,-1.175 1,-1.175
  F.Paste region: -0.9,-1.175 -0.9,-1.68 -1.1,-1.68 -1.1,-1.275 -1,-1.175
  F.Paste region: -1.175,1 -1.175,0.9 -1.68,0.9 -1.68,1.1 -1.275,1.1
  F.Paste region: -1.175,-1 -1.275,-1.1 -1.68,-1.1 -1.68,-0.9 -1.175,-0.9
  F.Paste region: -0.9,1.175 -1,1.175 -1.1,1.275 -1.1,1.68 -0.9,1.68
  F.Paste region: -0.9,-1.175 -0.9,-1.68 -1.1,-1.68 -1.1,-1.275 -1,-1.175
  F.Paste region: 1.1,-1.275 1.1,-1.68 0.9,-1.68 0.9,-1.175 1,-1.175
  F.Paste region: 1.1,1.275 1,1.175 0.9,1.175 0.9,1.68 1.1,1.68
  F.Paste region: 1.68,0.9 1.175,0.9 1.175,1 1.275,1.1 1.68,1.1
  F.Paste region: 1.68,-1.1 1.275,-1.1 1.175,-1 1.175,-0.9 1.68,-0.9
  F.Paste region: -1.175,0.5 -1.68,0.5 -1.68,0.7 -1.175,0.7
  F.Paste region: -1.175,0.1 -1.68,0.1 -1.68,0.3 -1.175,0.3
  F.Paste region: -1.175,-0.3 -1.68,-0.3 -1.68,-0.1 -1.175,-0.1
  F.Paste region: -1.175,-0.7 -1.68,-0.7 -1.68,-0.5 -1.175,-0.5
  F.Paste region: 0.72,-0.72 -0.72,-0.72 -0.72,0.72 0.72,0.72
  F.Paste region: -0.5,-1.68 -0.7,-1.68 -0.7,-1.175 -0.5,-1.175
  F.Paste region: -0.5,1.175 -0.7,1.175 -0.7,1.68 -0.5,1.68
  F.Paste region: -0.1,1.175 -0.3,1.175 -0.3,1.68 -0.1,1.68
  F.Paste region: -0.1,-1.68 -0.3,-1.68 -0.3,-1.175 -0.1,-1.175
  F.Paste region: 0.3,1.175 0.1,1.175 0.1,1.68 0.3,1.68
  F.Paste region: 0.3,-1.68 0.1,-1.68 0.1,-1.175 0.3,-1.175
  F.Paste region: 0.7,1.175 0.5,1.175 0.5,1.68 0.7,1.68
  F.Paste region: 0.7,-1.68 0.5,-1.68 0.5,-1.175 0.7,-1.175
  F.Paste region: 1.68,0.5 1.175,0.5 1.175,0.7 1.68,0.7
  F.Paste region: 1.68,0.1 1.175,0.1 1.175,0.3 1.68,0.3
  F.Paste region: 1.68,-0.3 1.175,-0.3 1.175,-0.1 1.68,-0.1
  F.Paste region: 1.68,-0.7 1.175,-0.7 1.175,-0.5 1.68,-0.5
  Dwgs.User circle w0.254: c-1,-1.8 r0.075
  F.CrtYd lines w0.254: 1.93,1.93 -1.93,1.93 -1.93,-1.93 1.93,-1.93 1.93,1.93
R_0805_2012Metric [mm]
  rrect24% 1.025x1.4 smd paste-1.4 mask-1.4: 1(-0.913,0) 2(0.913,0)
  F.SilkS lines w0.254: -0.227,-0.735 0.227,-0.735 ; -0.227,0.735 0.227,0.735
  F.CrtYd lines w0.254: -1.68,-0.95 1.68,-0.95 1.68,0.95 -1.68,0.95 -1.68,-0.95
SENSORS-SMD_MS5611-01BA03 [mm]
  rect 0.6x1.5 smd paste-1.5 mask-1.5: 1(-1.875,-1.3) 2(-0.625,-1.3) 3(0.625,-1.3) 4(1.875,-1.3) 5(1.875,1.3) 6(0.625,1.3) 7(-0.625,1.3) 8(-1.875,1.3)
  F.SilkS lines w0.254: 2.425,1.7 2.7,1.7 2.7,-1.7 2.425,-1.7 ; -2.425,1.7 -2.7,1.7 -2.7,-1.7 -2.425,-1.7 ; -2.599,-2.019 cw(c-2.6,-2.099) -2.601,-2.019
  Dwgs.User circle w0.254: c-1.893,-2.007 r0.127
  F.CrtYd lines w0.254: 2.776,2.3 -2.805,2.3 -2.805,-2.3 2.776,-2.3 2.776,2.3
SOT-89-3_L4.5-W2.4-P1.50-LS4.0-BR [mm]
  rect 1.575x0.672 smd paste-1.575 mask-1.575: 1(1.356,-1.5) 3(1.356,1.5)
  F.Cu region: -0.385,0.949 -0.34,0.946 -0.296,0.94 -0.252,0.934 -0.208,0.924 -0.165,0.913 -0.122,0.9 -0.081,0.884 -0.04,0.867 0.001,0.847 0.039,0.827 0.078,0.803 0.115,0.779 0.151,0.753 0.186,0.724 0.219,0.695 0.25,0.664 0.281,0.631 0.31,0.597 0.337,0.562 0.363,0.526 0.386,0.488 0.408,0.449 0.429,0.409 0.447,0.33 2.144,0.33 2.144,-0.33 0.447,-0.33 0.429,-0.41 0.408,-0.449 0.386,-0.488 0.363,-0.526 0.337,-0.562 0.31,-0.597 0.281,-0.631 0.25,-0.664 0.219,-0.695 0.186,-0.724 0.151,-0.753 0.115,-0.779 0.078,-0.804 0.039,-0.827 0.001,-0.848 -0.04,-0.867 -0.081,-0.884 -0.122,-0.9 -0.165,-0.913 -0.208,-0.924 -0.252,-0.934 -0.296,-0.941 -0.34,-0.946 -0.385,-0.949 -0.429,-0.95 -2.283,-0.95 -2.327,-0.949 -2.372,-0.946 -2.417,-0.941 -2.461,-0.934 -2.504,-0.924 -2.547,-0.913 -2.589,-0.9 -2.631,-0.884 -2.672,-0.867 -2.712,-0.848 -2.752,-0.827 -2.79,-0.804 -2.827,-0.779 -2.863,-0.753 -2.897,-0.724 -2.931,-0.695 -2.963,-0.664 -2.993,-0.631 -3.022,-0.597 -3.049,-0.562 -3.074,-0.526 -3.099,-0.488 -3.12,-0.449 -3.14,-0.41 -3.159,-0.369 -3.175,-0.327 -3.19,-0.285 -3.202,-0.243 -3.212,-0.199 -3.22,-0.155 -3.226,-0.111 -3.231,-0.067 -3.233,-0.022 -3.233,0.022 -3.231,0.067 -3.226,0.111 -3.22,0.155 -3.212,0.199 -3.202,0.242 -3.19,0.285 -3.175,0.327 -3.159,0.369 -3.14,0.409 -3.12,0.449 -3.099,0.488 -3.074,0.526 -3.049,0.562 -3.022,0.597 -2.993,0.631 -2.963,0.664 -2.931,0.695 -2.897,0.724 -2.863,0.753 -2.827,0.779 -2.79,0.803 -2.752,0.827 -2.712,0.847 -2.672,0.867 -2.631,0.884 -2.589,0.9 -2.547,0.913 -2.504,0.924 -2.461,0.934 -2.417,0.94 -2.372,0.946 -2.327,0.949 -2.283,0.95 -0.429,0.95
  F.Mask region: -0.385,0.949 -0.34,0.946 -0.296,0.94 -0.252,0.934 -0.208,0.924 -0.165,0.913 -0.122,0.9 -0.081,0.884 -0.04,0.867 0.001,0.847 0.039,0.827 0.078,0.803 0.115,0.779 0.151,0.753 0.186,0.724 0.219,0.695 0.25,0.664 0.281,0.631 0.31,0.597 0.337,0.562 0.363,0.526 0.386,0.488 0.408,0.449 0.429,0.409 0.447,0.33 2.144,0.33 2.144,-0.33 0.447,-0.33 0.429,-0.41 0.408,-0.449 0.386,-0.488 0.363,-0.526 0.337,-0.562 0.31,-0.597 0.281,-0.631 0.25,-0.664 0.219,-0.695 0.186,-0.724 0.151,-0.753 0.115,-0.779 0.078,-0.804 0.039,-0.827 0.001,-0.848 -0.04,-0.867 -0.081,-0.884 -0.122,-0.9 -0.165,-0.913 -0.208,-0.924 -0.252,-0.934 -0.296,-0.941 -0.34,-0.946 -0.385,-0.949 -0.429,-0.95 -2.283,-0.95 -2.327,-0.949 -2.372,-0.946 -2.417,-0.941 -2.461,-0.934 -2.504,-0.924 -2.547,-0.913 -2.589,-0.9 -2.631,-0.884 -2.672,-0.867 -2.712,-0.848 -2.752,-0.827 -2.79,-0.804 -2.827,-0.779 -2.863,-0.753 -2.897,-0.724 -2.931,-0.695 -2.963,-0.664 -2.993,-0.631 -3.022,-0.597 -3.049,-0.562 -3.074,-0.526 -3.099,-0.488 -3.12,-0.449 -3.14,-0.41 -3.159,-0.369 -3.175,-0.327 -3.19,-0.285 -3.202,-0.243 -3.212,-0.199 -3.22,-0.155 -3.226,-0.111 -3.231,-0.067 -3.233,-0.022 -3.233,0.022 -3.231,0.067 -3.226,0.111 -3.22,0.155 -3.212,0.199 -3.202,0.242 -3.19,0.285 -3.175,0.327 -3.159,0.369 -3.14,0.409 -3.12,0.449 -3.099,0.488 -3.074,0.526 -3.049,0.562 -3.022,0.597 -2.993,0.631 -2.963,0.664 -2.931,0.695 -2.897,0.724 -2.863,0.753 -2.827,0.779 -2.79,0.803 -2.752,0.827 -2.712,0.847 -2.672,0.867 -2.631,0.884 -2.589,0.9 -2.547,0.913 -2.504,0.924 -2.461,0.934 -2.417,0.94 -2.372,0.946 -2.327,0.949 -2.283,0.95 -0.429,0.95
  F.SilkS lines w0.254: -1.65,-1.178 -1.65,-2.326 1.002,-2.326 ; -1.65,1.178 -1.65,2.327 1.002,2.327
  F.Paste region: -0.385,0.949 -0.34,0.946 -0.296,0.94 -0.252,0.934 -0.208,0.924 -0.165,0.913 -0.122,0.9 -0.081,0.884 -0.04,0.867 0.001,0.847 0.039,0.827 0.078,0.803 0.115,0.779 0.151,0.753 0.186,0.724 0.219,0.695 0.25,0.664 0.281,0.631 0.31,0.597 0.337,0.562 0.363,0.526 0.386,0.488 0.408,0.449 0.429,0.409 0.447,0.33 2.144,0.33 2.144,-0.33 0.447,-0.33 0.429,-0.41 0.408,-0.449 0.386,-0.488 0.363,-0.526 0.337,-0.562 0.31,-0.597 0.281,-0.631 0.25,-0.664 0.219,-0.695 0.186,-0.724 0.151,-0.753 0.115,-0.779 0.078,-0.804 0.039,-0.827 0.001,-0.848 -0.04,-0.867 -0.081,-0.884 -0.122,-0.9 -0.165,-0.913 -0.208,-0.924 -0.252,-0.934 -0.296,-0.941 -0.34,-0.946 -0.385,-0.949 -0.429,-0.95 -2.283,-0.95 -2.327,-0.949 -2.372,-0.946 -2.417,-0.941 -2.461,-0.934 -2.504,-0.924 -2.547,-0.913 -2.589,-0.9 -2.631,-0.884 -2.672,-0.867 -2.712,-0.848 -2.752,-0.827 -2.79,-0.804 -2.827,-0.779 -2.863,-0.753 -2.897,-0.724 -2.931,-0.695 -2.963,-0.664 -2.993,-0.631 -3.022,-0.597 -3.049,-0.562 -3.074,-0.526 -3.099,-0.488 -3.12,-0.449 -3.14,-0.41 -3.159,-0.369 -3.175,-0.327 -3.19,-0.285 -3.202,-0.243 -3.212,-0.199 -3.22,-0.155 -3.226,-0.111 -3.231,-0.067 -3.233,-0.022 -3.233,0.022 -3.231,0.067 -3.226,0.111 -3.22,0.155 -3.212,0.199 -3.202,0.242 -3.19,0.285 -3.175,0.327 -3.159,0.369 -3.14,0.409 -3.12,0.449 -3.099,0.488 -3.074,0.526 -3.049,0.562 -3.022,0.597 -2.993,0.631 -2.963,0.664 -2.931,0.695 -2.897,0.724 -2.863,0.753 -2.827,0.779 -2.79,0.803 -2.752,0.827 -2.712,0.847 -2.672,0.867 -2.631,0.884 -2.589,0.9 -2.547,0.913 -2.504,0.924 -2.461,0.934 -2.417,0.94 -2.372,0.946 -2.327,0.949 -2.283,0.95 -0.429,0.95
  Dwgs.User circle w0.254: c1.833,-1.398 r0.15
  F.CrtYd lines w0.254: -3.483,-2.555 2.394,-2.555 2.394,2.525 -3.483,2.525 -3.483,-2.555
TE_2340901-1 [mm]
  rect 0.6x1.15 smd paste-1.15 mask-1.15: A1/B12(-3.2,5.275) A4/B9(-2.4,5.275) B1/A12(3.2,5.275) B4/AP(2.4,5.275)
  rect 0.3x1.15 smd paste-1.15 mask-1.15: A5(-1.25,5.275) A6(-0.25,5.275) A7(0.25,5.275) A8(1.25,5.275) B5(1.75,5.275) B6(0.75,5.275) B7(-0.75,5.275) B8(-1.75,5.275)
  rrect100% 1.05x1.85 hole 1.45 slot 0.65 at 0 deg paste-2539.97 mask-1.85: SH1(-5.62,4) SH2(5.62,4)
  rrect100% 1.05x2.25 hole 1.85 slot 0.65 at 0 deg paste-2539.97 mask-2.25: SH3(-5.62,0) SH4(5.62,0)
  F.SilkS circle w0.254: c-3.25,6.35 r0.1
  Edge.Cuts lines w0.254: -4.62,-2.2 4.62,-2.2 4.62,4.7 -4.62,4.7 -4.62,-2.2
  F.CrtYd lines w0.254: -6.395,-2.45 6.395,-2.45 6.395,6.1 -6.395,6.1 -6.395,-2.45
TO-220-3_Vertical [mm]
  rect 1.905x2 hole 1.1 paste-2539.97 mask-2: 1(0,0)
  rrect100% 1.905x2 hole 1.1 paste-2539.97 mask-2: 2(2.54,0) 3(5.08,0)
  F.SilkS lines w0.254: 0.69,3.26 0.69,1.88 ; 4.39,3.26 4.39,1.88 ; -2.57,1.88 7.65,1.88 ; -2.57,3.26 -2.57,-1.36 7.65,-1.36 7.65,3.26 -2.57,3.26
  F.CrtYd lines w0.254: -2.71,3.4 7.79,3.4 7.79,-1.5 -2.71,-1.5 -2.71,3.4
TO-252-2_L6.6-W5.6-P2.3-LS9.7 [mm]
  rect 3x1.6 smd paste-3 mask-3: 1(3.423,-2.3) 3(3.424,2.3)
  rect 6.2x5.8 smd paste-6.2 mask-6.2: 2(-3.424,0)
  F.SilkS lines w0.254: -4.584,-3.34 1.382,-3.34 1.382,3.353 -4.584,3.353
  Dwgs.User circle w0.254: c4.953,-2.28 r0.3
  F.CrtYd lines w0.254: -6.774,-3.607 5.174,-3.607 5.174,3.574 -6.774,3.574 -6.774,-3.607
WLCSP-12_L1.6-W1.6_BMM150 [mm]
  round 0.2 smd paste-0.2 mask-0.2: A1(0.566,0.566) A3(0.566,0) A5(0.566,-0.566) B2(0.283,0.283) B4(0.283,-0.283) C1(0,0.566) C5(0,-0.566) D2(-0.283,0.283) D4(-0.283,-0.283) E1(-0.566,0.566) E3(-0.566,0) E5(-0.566,-0.566)
  F.SilkS lines w0.254: 0.851,0.65 0.65,0.851 -0.849,0.851 -0.849,-0.849 0.851,-0.849 0.851,0.101 0.851,0.65
  Dwgs.User circle w0.254: c0.889,0.635 r0.075
  F.CrtYd lines w0.254: 1.086,1.085 -1.055,1.085 -1.055,-1.055 1.086,-1.055 1.086,1.085